# Altium PCB ver2.PcbDoc
Units mil, origin at the board's own origin, x right, y up, seen from the top; angles counter-clockwise.
Board outline 6000 x 4000 mil, 2 copper layers (Top Layer, Bottom Layer); 38 components, 22 nets, 170 pads, 0 vias.
Unrouted connection lines stored in the file: 103.
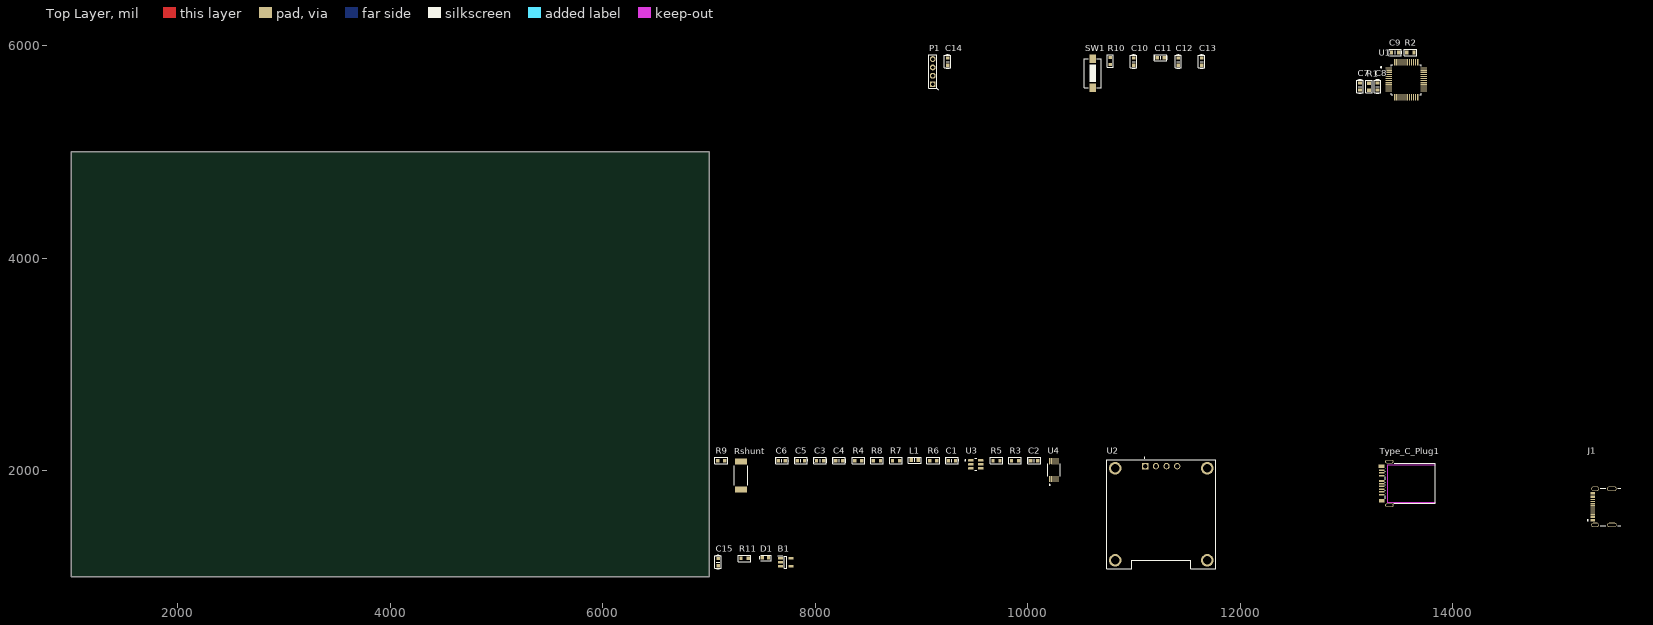
[diagram p0: Top Layer view]
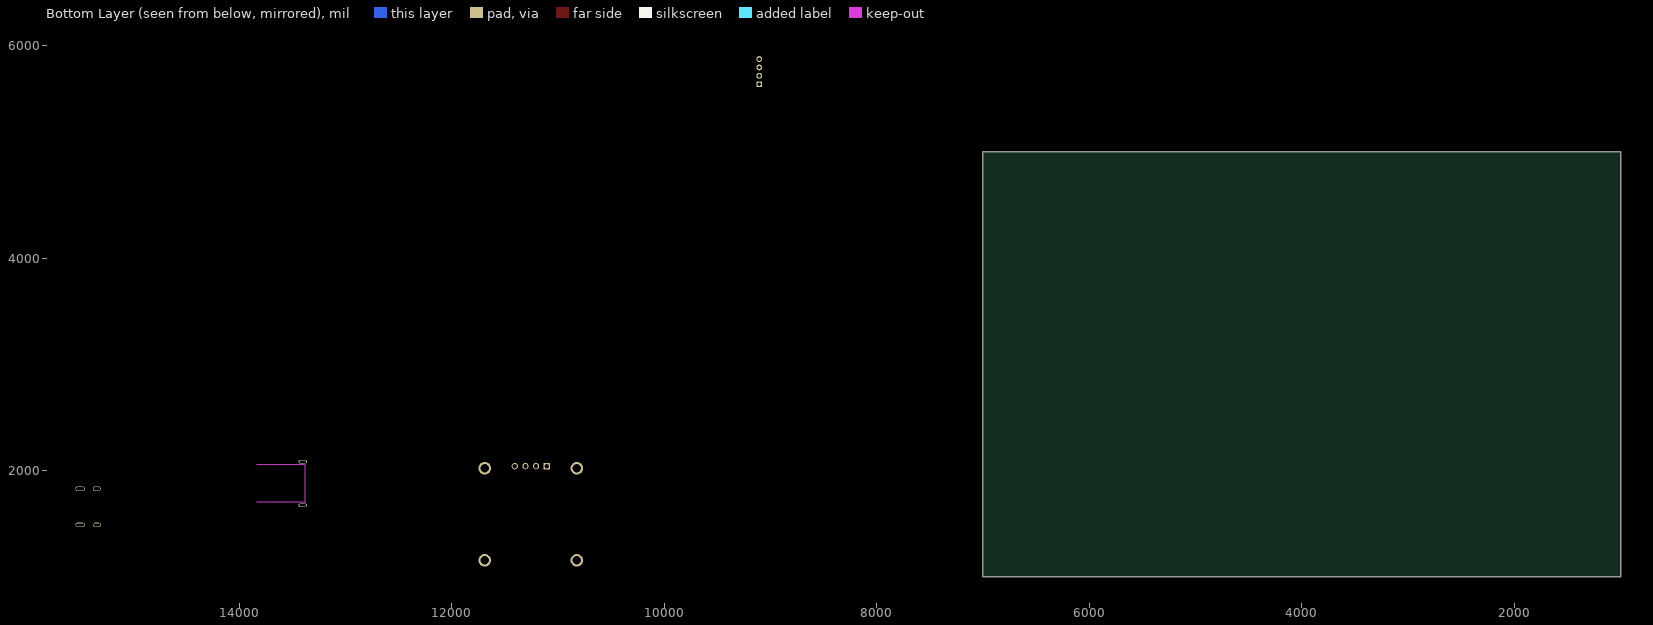
[diagram p1: Bottom Layer view, seen from below]

## Layer stack, top to bottom
Top Solder: solder mask 0.4, Solder Resist, Dk 3.5
Top Layer: signal copper 1.4
Dielectric 1: dielectric 12.6, FR-4, Dk 4.8
Bottom Layer: signal copper 1.4
Bottom Solder: solder mask 0.4, Solder Resist, Dk 3.5

## Board outline
1000,1000 7000,1000 7000,5000 1000,5000

## Design rules (kind name [scope] priority, off if disabled: settings)
Clearance [All] p1: gap=10 ignorepadtopadclearanceinfootprint=FALSE
PolygonConnect [All] p1: connectstyle=Relief reliefconductorwidth=10 reliefentries=4 polygonreliefangle="90 Angle" airgapwidth=10
RoutingVias [All] p1: holewidth=28 width=50 viastyle="Through Hole" minholewidth=28 minwidth=50 maxholewidth=28 maxwidth=50
SolderMaskExpansion [All] p1: expansion=4 istentingtop=FALSE
Width [All] p1: maxlimit=10 minlimit=10 preferedwidth=10
30 further rules are at their usual default settings.

## Components (designator, comment, footprint, x,y, rotation, side; value= is the part's Value field where it differs from the comment)
B1 "MIC5219-3.3YM5-TR" SOT95P280X145-5N 7720,1140 r0 top
C1 "100nF" "C 0603" 9285,2095 r0 top
C2 "104" "C 0603" 10060,2095 r0 top
C3 "10uF" "C 0603" 8045,2095 r0 top
C4 "2.2nF" "C 0603" 8225,2095 r0 top
C5 "100nF" "C 0603" 7865,2095 r0 top
C6 "22pF" "C 0603" 7685,2095 r0 top
C7 "100nF" "C 0603" 13125,5615 r90 top
C8 "1nF" "C 0603" 13290,5615 r90 top
C9 "100nF" "C 0603" 13455,5935 r180 top
C10 "100nF" "C 0603" 10995,5850 r90 top
C11 "100nF" "C 0603" 11250,5885 r0 top
C12 "100nF" "C 0603" 11415,5850 r90 top
C13 "10nF" "C 0603" 11635,5850 r90 top
C14 "100nF" "C 0603" 9245,5850 r90 top
C15 "22pF" "C 0603" 7085,1140 r90 top
D1 "Led" "Led 0603 - red" 7530,1180 r0 top
J1 "GT-USB-7010B" G-SWITCH_GT-USB-7010B 15495,1660 r90 top
L1 "10uH" "L 0603 (1608)" 8935,2100 r0 top
P1 "Header 4" HDR/Header/4/2mm 9105,5755 r90 top
R1 "0" "R 0603" 13210,5613.46 r90 top
R2 "10K" "R 0603" 13600,5935 r0 top
R3 "10K" "R 0603" 9880,2095 r0 top
R4 "157k" "R 0603" 8405,2095 r0 top
R5 "10K" "R 0603" 9705,2095 r0 top
R6 "10K" "R 0603" 9110,2095 r0 top
R7 "10K" "R 0603" 8760,2095 r0 top
R8 "10K" "R 0603" 8580,2095 r0 top
R9 "30k" "R 0603" 7115,2095 r0 top
R10 "10k" "R 0603" 10775,5855 r90 top
R11 "1K" "R 0603" 7335,1175 r0 top
Rshunt "0.01" RES_ERJU1TF4700U 7300,1955 r90 top
SW1 "Button" SW/2/SMD 10610,5740 r90 top
Type_C_Plug1 "GT-USB-8016A" USB-TYPE-C-SMD_GT-USB-8016A 13365,1880 r90 top
U1 "STM32F103C8T6" QFP50P900X900X160-48N 13560,5680 r0 top
U2 "DM-OLED096-636" MODULE_DM-OLED096-636 11255,1590 r0 top
U3 "AP63201WU-7" SOP95P280X100-6N 9510,2060 r0 top
U4 "INA226AIDGSR" SOP50P490X110-10N 10245,2005 r90 top

## Footprints (in the part's own frame and the unit in brackets; to place one, negate y for a bottom-side part, rotate by r counter-clockwise, add the part's x,y. Pads: shape width x height; smd on the part's side, far side on the other; paste and mask are expansions set on the pad)
"C 0603" [mm] "Chip Capacitor, 2-Leads, Body 1.6x0.8mm, IPC Medium Density"
  rect 0.8x0.85 smd: 1(-0.85,0) 2(0.85,0)
  silkscreen extent -1.6,-0.75 1.6,0.75, body extent -0.8,-0.43 0.8,0.43, height 0.81
G-SWITCH_GT-USB-7010B [mm]
  rect 0.6x1.15 smd mask+0.05: A1_B12(-3.2,4.565) A4_B9(-2.4,4.565) B1_A12(3.2,4.565) B4_A9(2.4,4.565)
  rect 0.3x1.15 smd mask+0.05: A5(-1.25,4.565) A6(-0.25,4.565) A7(0.25,4.565) A8(1.25,4.565) B5(1.75,4.565) B6(0.75,4.565) B7(-0.75,4.565) B8(-1.75,4.565)
  oval 1.05x1.85 hole 0.65 slot 1.45 at 90 deg: SH1(-4.32,4) SH2(4.32,4)
  oval 1.05x2.25 hole 0.65 slot 1.85 at 90 deg: SH3(-4.32,0) SH4(4.32,0)
  silkscreen extent -4.47,-2.1 4.47,5.85
HDR/Header/4/2mm [mm]
  rect 1.4x1.4 hole 0.8: 1(-3,0)
  round 1.4 hole 0.8: 2(-1,0) 3(1,0) 4(3,0)
  silkscreen extent -4.3,-1.3 4,1, body extent -3.98,-1 3.97,1, height 6
"L 0603 (1608)" [mm] "Chip Capacitor, 2-Leads, Body 1.6x0.8mm, IPC Medium Density"
  rect 0.85x0.9 smd: 1(-0.825,0) 2(0.825,0)
  silkscreen extent -1.53,-0.7 1.53,0.7, body extent -0.8,-0.48 0.8,0.48, height 0.8
"Led 0603 - red" [mm] "Led SMD 0603"
  rect 0.8x0.8 smd: 1(-0.75,0) 2(0.75,0)
  silkscreen extent -1.4,-0.64 1.4,0.64, body extent -0.81,-0.4 0.81,0.4, height 0.6
MODULE_DM-OLED096-636 [mm]
  rect 1.508x1.508 / inner round 1.508 / far side rect 1.508x1.508 hole 1: 1(-3.81,11.5)
  round 1.508 hole 1: 2(-1.27,11.5) 3(1.27,11.5) 4(3.81,11.5)
  round 3 hole 2: S1(-11,11) S2(11,11) S3(11,-11) S4(-11,-11)
  silkscreen extent -13,-13 13,13.6, body extent -13,-13 13,13, height 5.66
QFP50P900X900X160-48N [mm]
  rrect50% 1.56x0.28 smd: 1(-4.18,2.75) 2(-4.18,2.25) 3(-4.18,1.75) 4(-4.18,1.25) 5(-4.18,0.75) 6(-4.18,0.25) 7(-4.18,-0.25) 8(-4.18,-0.75) 9(-4.18,-1.25) 10(-4.18,-1.75) 11(-4.18,-2.25) 12(-4.18,-2.75) 25(4.18,-2.75) 26(4.18,-2.25) 27(4.18,-1.75) 28(4.18,-1.25) 29(4.18,-0.75) 30(4.18,-0.25) 31(4.18,0.25) 32(4.18,0.75) 33(4.18,1.25) 34(4.18,1.75) 35(4.18,2.25) 36(4.18,2.75)
  rrect50% 0.28x1.56 smd: 13(-2.75,-4.18) 14(-2.25,-4.18) 15(-1.75,-4.18) 16(-1.25,-4.18) 17(-0.75,-4.18) 18(-0.25,-4.18) 19(0.25,-4.18) 20(0.75,-4.18) 21(1.25,-4.18) 22(1.75,-4.18) 23(2.25,-4.18) 24(2.75,-4.18) 37(2.75,4.18) 38(2.25,4.18) 39(1.75,4.18) 40(1.25,4.18) 41(0.75,4.18) 42(0.25,4.18) 43(-0.25,4.18) 44(-0.75,4.18) 45(-1.25,4.18) 46(-1.75,4.18) 47(-2.25,4.18) 48(-2.75,4.18)
  silkscreen extent -6.15,-3.6 3.6,3.6, body extent -4.5,-4.5 4.5,4.5, height 1.6
"R 0603" [mm] "Chip Resistor, 2-Leads, Body 1.6x0.8mm, IPC Medium Density"
  rect 0.8x0.85 smd: 1(-0.85,0) 2(0.85,0)
  silkscreen extent -1.5,-0.75 1.5,0.75, body extent -0.8,-0.4 0.8,0.4, height 0.5
RES_ERJU1TF4700U [mm]
  rect 1.45x2.9 smd: 1(-3.325,0) 2(3.325,0)
  silkscreen extent -2.28,-1.6 2.28,1.6
SOP50P490X110-10N [mm]
  rrect25% 1.47x0.28 smd: 1(-2.15,1) 2(-2.15,0.5) 3(-2.15,0) 4(-2.15,-0.5) 5(-2.15,-1) 6(2.15,-1) 7(2.15,-0.5) 8(2.15,0) 9(2.15,0.5) 10(2.15,1)
  silkscreen extent -3.6,-1.5 1.5,1.5, body extent -2.45,-1.5 2.45,1.5, height 1.1
SOP95P280X100-6N [mm]
  rrect25% 1.24x0.55 smd: 1(-1.185,0.95) 2(-1.185,0) 3(-1.185,-0.95) 4(1.185,-0.95) 5(1.185,0) 6(1.185,0.95)
  silkscreen extent -2.6,-1.45 0.25,1.45, body extent -1.45,-1.45 1.45,1.45, height 1
SOT95P280X145-5N [mm]
  rect 1.2x0.6 smd: 1(-1.25,0.95) 2(-1.25,0) 3(-1.25,-0.95) 4(1.25,-0.95) 5(1.25,0.95)
  silkscreen extent -1.85,-1.45 0.3,1.5, body extent -1.27,-1.45 1.53,1.45, height 1.45
SW/2/SMD [mil]
  rect 80x60 smd: 1(-135,0) 2(135,0)
  silkscreen extent -135,-80 135,80, body extent -120,-73 120,73, height 98
USB-TYPE-C-SMD_GT-USB-8016A [mm]
  rect 0.8x1.34 smd paste-100 mask+0.051: 1(-4.1,0.915)
  rect 0.8x1.4 smd paste-100 mask+0.051: 2(4.1,0.915)
  oval 0.8x2.03 hole 0.5 slot 1.53 at 90 deg: 3(-5.225,-0.915) 4(5.225,-0.915)
  rect 0.38x1.34 smd paste-100 mask+0.051: A1(3.19,0.915) A2(2.54,0.915) A3(1.89,0.915) A5(0.59,0.915) A6(-0.06,0.915) A7(-0.71,0.915) A9(-1.36,0.915) B10(-2.66,0.915) B11(-2.01,0.915)
  Keep-Out Layer lines w0.254: -4.475,-0.375 4.475,-0.375 ; -4.475,-0.375 -4.475,-11.925 -4.475,-0.375 ; -4.475,-0.375 4.475,-0.375 ; 4.475,-0.375 4.475,-11.925 4.475,-0.375
  silkscreen extent -4.75,-11.92 4.77,0.04

## Part data
B1: "LDO Regulator Pos 3.3V 0.5A Microchip MIC5219-3.3YM5-TR, LDO Voltage Regulator, 500mA, 3.3 V +/-2%, 2.5  12 Vin, 5-Pin SOT-23", Manufacturer_Name=Microchip, Mouser Part Number=998-MIC5219-3.3YM5TR, Arrow Part Number=MIC5219-3.3YM5-TR, Arrow Price/Stock=https://www.arrow.com/en/products/mic5219-3.3ym5-tr/microchip-technology?utm_currency=USD&region=nac, Datasheet Link=http://www.microchip.com/mymicrochip/filehandler.aspx?ddocname=en579712, Geometry.Height=1.45mm, Manufacturer_Part_Number=MIC5219-3.3YM5-TR, Mouser Price/Stock=https://www.mouser.co.uk/ProductDetail/Microchip-Technology/MIC5219-3.3YM5-TR?qs=U6T8BxXiZAWojkIJMtSJlw%3D%3D
C1 C2 C3 C4 C5 C6 C7 C8 C9 C10 C11 C12 C13 C14 C15: library part "Capacitor NP", "Capacitor non-pol"
D1: "Typical LED"
J1: "Horizontal Type-C 16P Female SMT", Package=None, Check_prices=https://www.snapeda.com/parts/GT-USB-7010B/G-switch/view-part/?ref=eda, MF=G-switch, MP=GT-USB-7010B, SnapEDA_Link=https://www.snapeda.com/parts/GT-USB-7010B/G-switch/view-part/?ref=snap
L1: library part Inductor, "Inductor"
P1: "Header, 4-Pin"
R1 R2 R3 R4 R5 R6 R7 R8 R9 R10 R11: library part Resistor, "Resistor"
Rshunt: library part ERJU1TF4700U, Package=None, Availability=Unavailable, MP=ERJU1TF4700U, Price=None
SW1: library part "SW SPST", "Tact switch 2 pin"
Type_C_Plug1: Current Rating-Power=-, Detection color=Black, JLCPCB Part Class="Extended Part", LCSC Part Name="Type-C 公 沉板", Manufacturer=G-Switch(品赞), Operating Temperature=-40℃~+85℃, Add into BOM=yes, Center Height=0.15mm, Connect-Disconnect Life=-, Connector Type=Type-C, Convert to PCB=yes, Datasheet=https://item.szlcsc.com/datasheet/GT-USB-8016A/3445597.html, Device=GT-USB-8016A, Gender=Male, Length=12mm, Manufacturer Part=GT-USB-8016A, Mounting Type="Laminated board", Number of Contacts=9P, Number of Ports=1, Protocol Standard="USB 2.0", Supplier=LCSC, Supplier Footprint=SMD, Supplier Part=C2988371, Symbol=GT-USB-8016A, Voltage Rating=-
U1: "ARM® Cortex®-M3 STM32F1 Microcontroller IC 32-Bit 72MHz 64KB (64K x 8) FLASH 48-LQFP (7x7)", Package="LQFP-48 STMicroelectronics", Check_prices=https://www.snapeda.com/parts/STM32F103C8T6/STMicroelectronics/view-part/?ref=eda, MF=STMicroelectronics, MP=STM32F103C8T6, SnapEDA_Link=https://www.snapeda.com/parts/STM32F103C8T6/STMicroelectronics/view-part/?ref=snap
U2: "0.96â€ 128 X 64 MONOCHROME GRAPHIC OLED DISPLAY MODULE - I2C", Package=Package, Check_prices=https://www.snapeda.com/parts/DM-OLED096-636/Display+Module/view-part/?ref=eda, MF="Display Module", MP=DM-OLED096-636, SnapEDA_Link=https://www.snapeda.com/parts/DM-OLED096-636/Display+Module/view-part/?ref=snap
U3: Package=None, Availability=Unavailable, MP=AP63201WU-7, Price=None
U4: "36V, 16-bit, ultra-precise i2c output current/voltage/power monitor w/alert", Package="VSSOP-10 Texas Instruments", Check_prices=https://www.snapeda.com/parts/INA226AIDGSR/Texas+Instruments/view-part/?ref=eda, MF="Texas Instruments", MP=INA226AIDGSR, SnapEDA_Link=https://www.snapeda.com/parts/INA226AIDGSR/Texas+Instruments/view-part/?ref=snap

## Nets (pads, with @x,y where several pads share a name; then routed paths per layer and width w, separated by ;. In a path a pad name is that pad's centre, name@x,y a point inside that pad or via, vN(x,y) a via of type N, cw(c..) or ccw(c..) an arc to the next point about the centre after c; other vN are vias at no path point)
3V3: B1.5 C2.1 C4.1 C9.2 C10.1 C11.1 C12.1 C13.1 D1.1 P1.4 R1.2 R3.1 R5.1 R6.1 R10.2 U1.1 U1.24 U1.36 U1.48 U2.1 U4.6
+5: B1.1 B1.3 C5.1 C6.1 C15.1 L1.2 R4.2
A0: R7.2 U4.2
A1: R8.2 U4.1
ALERT: R6.2 U4.3
CC1: J1.A5 Type_C_Plug1.A5
D+: J1.A6 J1.B6 Type_C_Plug1.A6
D-: J1.A7 J1.B7 Type_C_Plug1.A7
GND: B1.2 C2.2 C3.2 C4.2 C6.2 C7.2 C8.2 C9.1 C10.2 C11.2 C12.2 C13.2 C14.2 C15.2 J1.A1_B12 J1.B1_A12 J1.SH1 J1.SH2 J1.SH3 J1.SH4 P1.1 R2.1 R7.1 R8.1 R9.1 R11.2 SW1.2 Type_C_Plug1.1 Type_C_Plug1.2 Type_C_Plug1.3 Type_C_Plug1.4 Type_C_Plug1.A1 U1.8 U1.23 U1.35 U1.47 U2.2 U3.4 U4.7
NetC1_1: C1.1 U3.6
NetC1_2: C1.2 L1.1 U3.5
NetC5_2: C5.2 R4.1 R9.2 U3.1
NetC7_1: C7.1 C8.1 R1.1 U1.9
NetD1_2: D1.2 R11.1
NetR2_2: R2.2 U1.44
NRST: C14.1 R10.1 SW1.1 U1.7
SCL: R5.2 U1.42 U2.3 U4.5
SDA: R3.2 U1.43 U2.4 U4.4
SWCLK: P1.3 U1.37
SWDIO: P1.2 U1.34
VBUS_IN: C3.1 J1.A4_B9 J1.B4_A9 Rshunt.2 U3.2 U3.3 U4.10
VBUS_OUT: Rshunt.1 Type_C_Plug1.A9 U4.8 U4.9
pads on no net: B1.4 J1.A8 J1.B5 J1.B8 Type_C_Plug1.A2 Type_C_Plug1.A3 Type_C_Plug1.B10 Type_C_Plug1.B11 U1.2 U1.3 U1.4 U1.5 U1.6 U1.10 U1.11 U1.12 U1.13 U1.14 U1.15 U1.16 U1.17 U1.18 U1.19 U1.20 U1.21 U1.22 U1.25 U1.26 U1.27 U1.28 U1.29 U1.30 U1.31 U1.32 U1.33 U1.38 U1.39 U1.40 U1.41 U1.45 U1.46 U2.S1 U2.S2 U2.S3 U2.S4

## Text inside footprints (layer, text, board x,y; h text height)
J1: Mechanical 13 "PCB EDGE" at 15563.9,1876.54 h32 r90